# Altium PCB Phaser.PcbDoc (part 14 of 16)
Units mm, origin at the board's own origin, x right, y up, seen from the top; angles counter-clockwise.
Board outline 161.99 x 100 mm, 6 copper layers (TopLayer, MidLayer1, MidLayer2, SignalLayer1, Internal Plane 1, BottomLayer), stack 1.528 mm thick; 1017 components, 665 nets, 3453 pads, 2223 vias.
Unrouted connection lines stored in the file: 1.
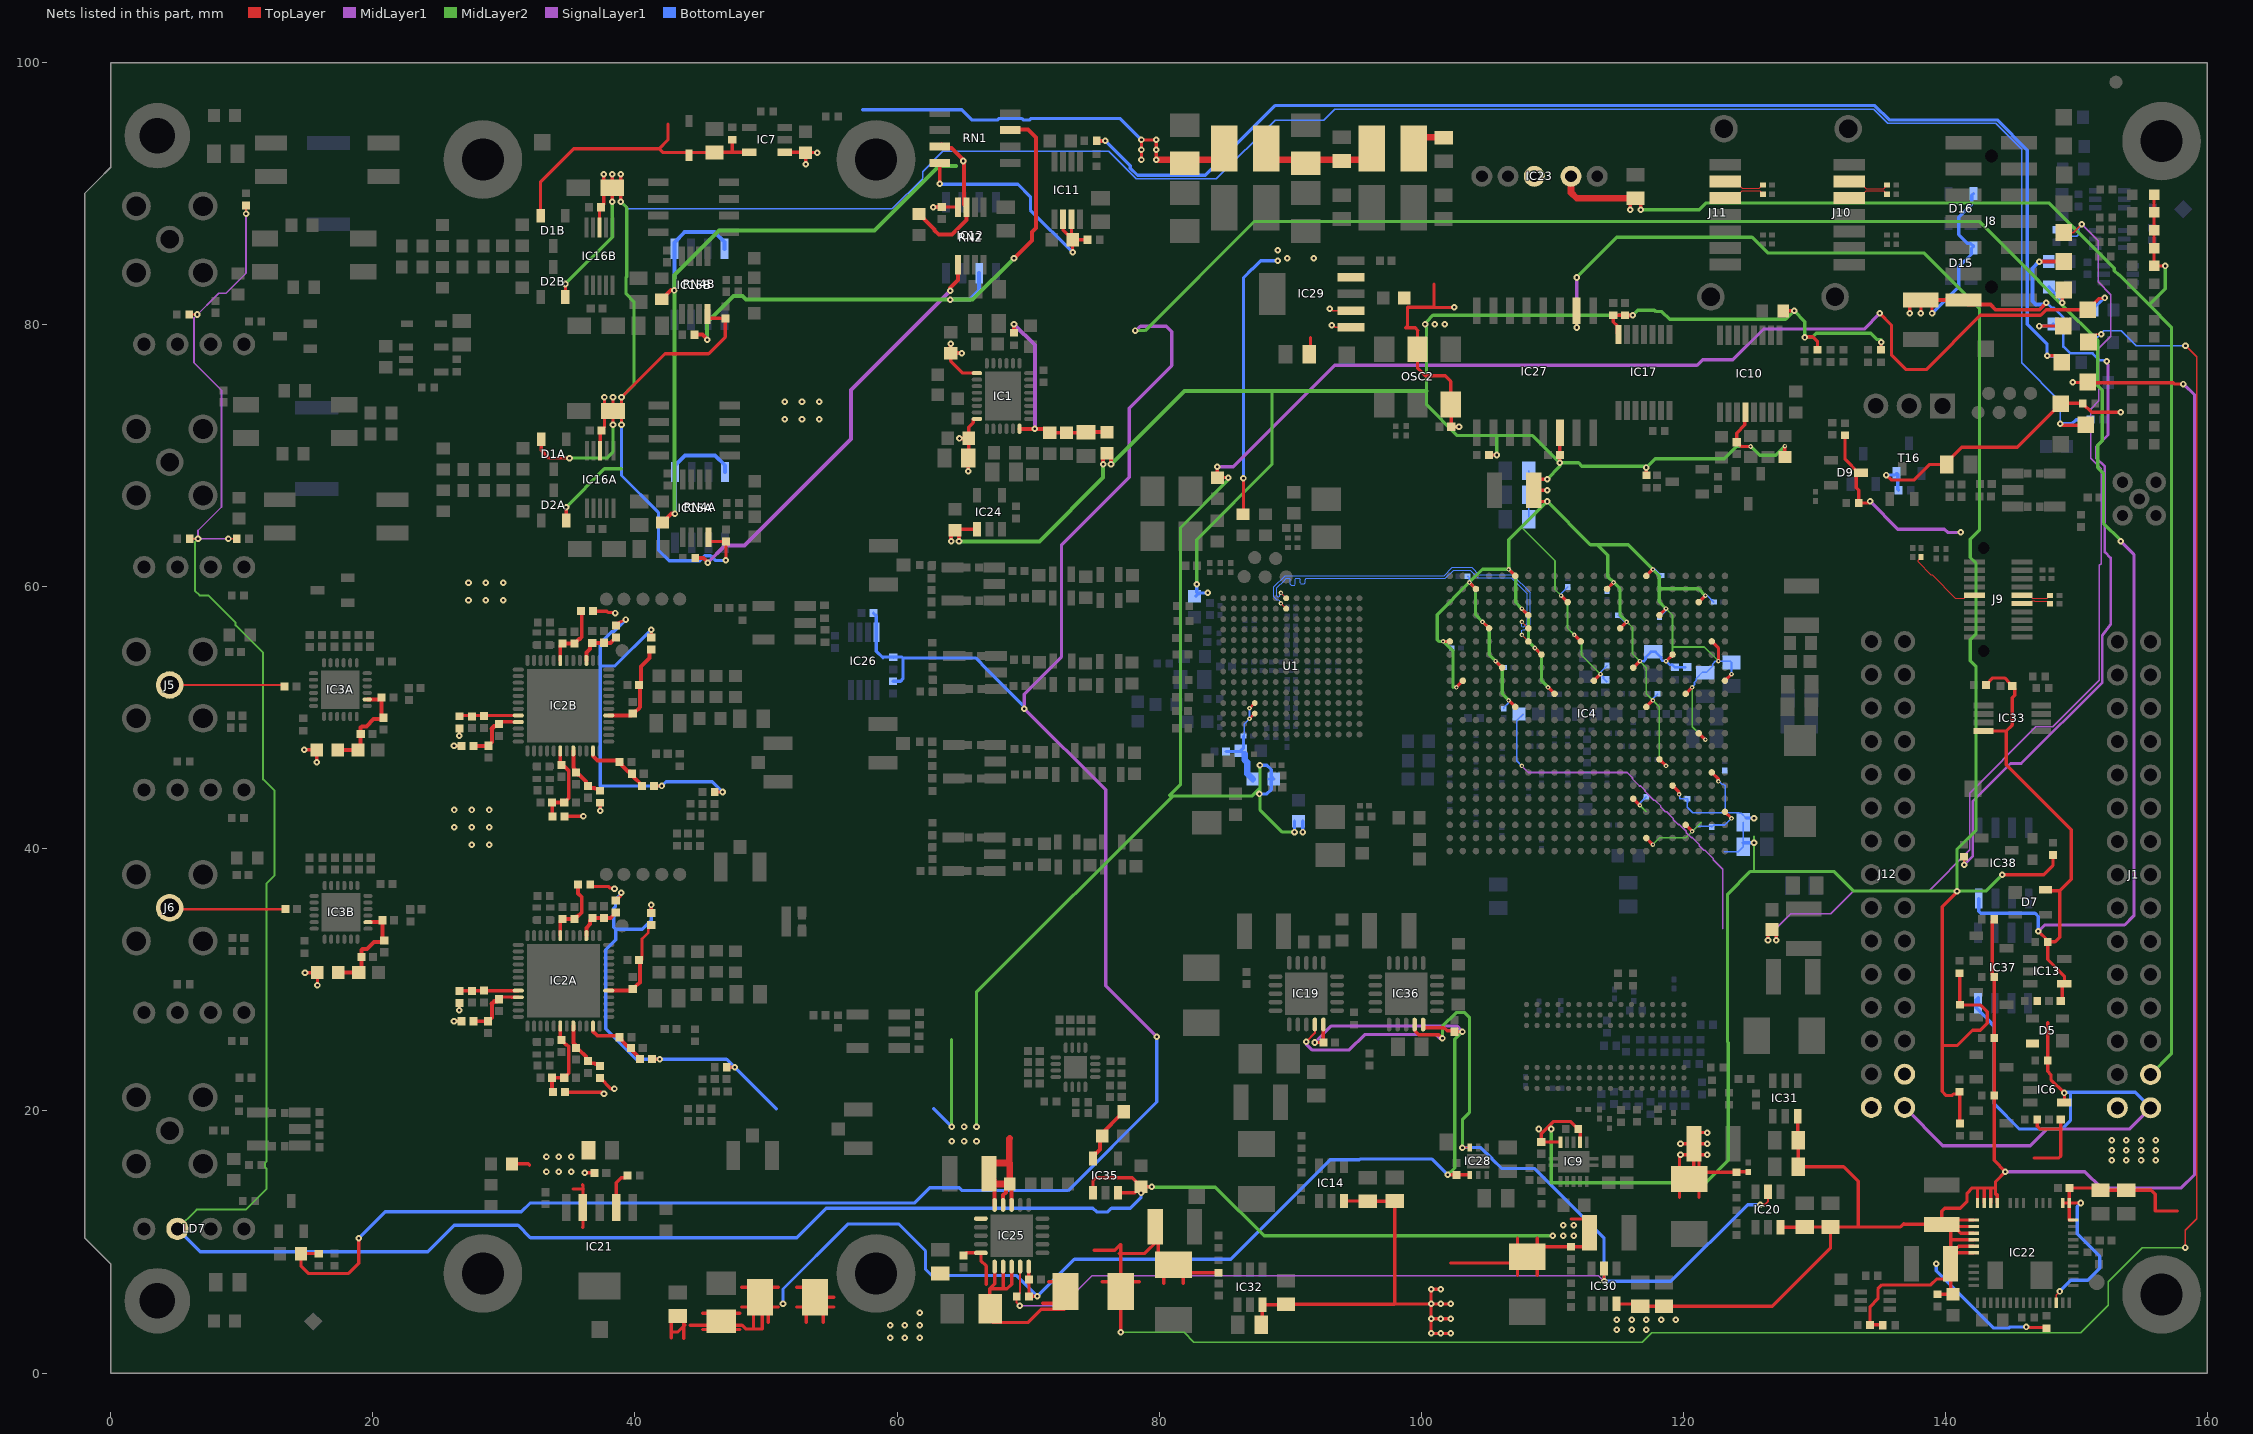
[diagram p16: the nets of this part, all layers, seen from the top]

## Via types
v1: diameter 0.5, hole 0.2, TopLayer to BottomLayer, tented both sides, 1374 vias
v2: diameter 0.35, hole 0.15, TopLayer to BottomLayer, tented both sides, 728 vias
v3: diameter 0.5, hole 0.2, TopLayer to BottomLayer, tented top, 96 vias
v4: diameter 0.6, hole 0.3, TopLayer to BottomLayer, 18 vias
v5: diameter 0.5, hole 0.2, TopLayer to BottomLayer, 5 vias
v6: diameter 0.35, hole 0.15, TopLayer to BottomLayer, 1 vias
v7: diameter 0.8, hole 0.5, TopLayer to BottomLayer, tented both sides, 1 vias

## Nets (pads, with @x,y where several pads share a name; then routed paths per layer and width w, separated by ;. In a path a pad name is that pad's centre, name@x,y a point inside that pad or via, vN(x,y) a via of type N, cw(c..) or ccw(c..) an arc to the next point about the centre after c; other vN are vias at no path point) (continued)
P1V8: C232.2 C336.2 L4.1 L26.1 L50.2 R166.2 R210.2 TP10.1 | length 124.9
  TopLayer w0.1: TP10.1@149.023,87.027 149.76,87.027 v1(150.394,87.661)
  TopLayer w0.25: 119.7,13.387 v1@119.7,16.651 ; v1(119.782,16.651) C336.2@120.8,16.651 ; v1(119.782,17.5) C336.2@120.8,17.5 ; L50.2@120.45,14.8 L50.2@120.8,15.15 ; C336.2@120.763,18.349 v1(121.818,18.349) ; 121.2,13.387 L50.2@121.2,15.315 ; C336.2@121.2,16.212 L50.2@121.2,15.315 ; v1(121.818,16.651) C336.2@120.8,16.651 ; v1(121.818,17.5) C336.2@120.8,17.5 ; C232.2@124.95,15.35 124.085,15.35 R166.2@124.05,15.315 L50.2@121.2,15.315 ; v1(126.457,33.025) L26.1@126.457,33.85 ; v1(127.093,33.025) L26.1@127.093,33.85 ; L50.2@120.8,15.15 C336.2@120.8,16.651 ; L50.2@120.8,15.15 120.965,15.315 L50.2@121.2,15.315 ; C336.2@120.8,16.651 C336.2@120.8,17.5
  MidLayer1 w0.125: v2(107.675,46.325) 108.174,45.826 115.722,45.826 116.118,45.43 116.118,45.334 116.655,44.797 116.751,44.797 117.069,44.479 117.069,44.383 117.74,43.712 117.836,43.712 118.288,43.26 118.288,43.164 118.627,42.825 118.723,42.825 119.231,42.317 119.231,42.221 119.599,41.853 119.695,41.853 120.217,41.331 120.217,41.235 120.592,40.86 120.688,40.86 121.214,40.334 121.214,40.238 121.553,39.899 121.649,39.899 122.288,39.26 122.288,39.164 123.005,38.447 123.005,33.925
  SignalLayer1 w0.1: v1(127.093,33.025) 127.093,33.954 128.202,35.063 131.258,35.063 133.012,36.817 138.747,36.817 141.844,39.914 141.844,44.256 146.906,49.317 148.184,49.317 151.738,52.871 151.738,61.62 151.881,61.763 151.881,69 151.07,69.811 151.07,73.56 151.691,74.181 151.691,78.192 152.606,79.107 152.606,82.296 151.643,83.259 151.643,86.412 v1(150.394,87.661)
  BottomLayer w0.1: R210.2@148.463,87.224 148.924,87.224 149.389,86.759 150.027,86.759 150.176,86.909 150.176,87.335 150.394,87.553 v1(150.394,87.661)
  BottomLayer w0.125: v2(107.675,46.325) 107.287,46.712 107.287,49.485 107.293,49.491 107.293,49.793 L4.1@107.775,50.275
P1V8A: C340.2 IC35.5 L10.2 | length 4.6
  TopLayer w0.3: IC35.5@74.954,16.363 74.954,16.588 75.104,16.738 75.171,16.738 75.493,17.06 75.493,18.135 L10.2@77.293,19.935
P2V5: C55.2 C58.2 C61.2 C62.2 C64.2 C66.2 C67.2 C68.2 C70.2 C71.2 C72.2 C73.2 C74.2 C75.2 C82.2 C207.2 C209.2 C210.2 C212.2 C217.2 C218.2 C238.2 C278.2 C279.2 C361.2 D15.4 D16.4 IC4.A17 IC4.AA17 IC4.AB14 IC4.B14 IC4.C21 IC4.D18 IC4.E15 IC4.F12 IC4.F22 IC4.G19 IC4.H16 IC4.J13 IC4.K20 IC4.L17 IC4.M14 IC4.N21 IC4.P18 IC4.R15 IC4.T12 IC4.T22 IC4.U8 IC4.U19 IC4.V16 IC4.W13 IC4.Y10 IC4.Y20 IC10.12 IC17.14 IC24.1 IC27.14 IC29.4 J8.2 L7.2 L8.2 OSC2.2 OSC2.6 R42.2 R57.2 R89.1 R93.2 R94.2 R95.2 R96.2 R185.2 R188.2 R211.2 R233.2 R235.2 R236.2 TP4.1 | length 408.1
  TopLayer w0.125: C58.2@138.127,81.873 C58.2@138.975,81.873
  TopLayer w0.2: v1(141.425,38.775) R57.2@141.425,39.38
  TopLayer w0.25: C55.2@64.425,64.325 64.475,64.375 IC24.1@66.1,64.375 ; 100.981,83.075 100.981,81.35 100.956,81.325 98.956,81.325 98.956,79.9 98.806,79.75 99.546,79.75 99.746,79.55 99.721,79.55 OSC2.2@99.721,78.105 99.721,76.66 100.29,76.091 101.833,76.091 102.261,75.663 OSC2.6@102.261,73.905 102.285,73.881 C238.2@102.285,72.207 v1(102.882,72.207) ; 101.006,81.325 101.021,81.31 v1(102.531,81.31) ; v2(101.675,55.825) IC4.A17@102.175,55.825 ; v2(102.675,52.325) IC4.B14@103.175,52.825 ; v2(103.675,60.325) IC4.C21@104.175,59.825 ; v2(104.675,57.325) IC4.D18@105.175,56.825 ; R96.2@105.17,70.05 v1(105.768,70.05) ; v2(105.675,54.325) IC4.E15@106.175,53.825 ; v2(106.675,51.325) IC4.F12@107.175,50.825 ; v2(106.675,61.325) IC4.F22@107.175,60.825 ; v2(107.675,58.325) IC4.G19@108.175,57.825 ; C218.2@108.586,66.506 v1(109.604,66.506) ; C218.2@108.586,67.355 v1(109.604,67.355) ; C218.2@108.586,68.204 v1(109.604,68.204) ; v2(108.675,55.325) IC4.H16@109.175,54.825 ; v2(109.675,52.325) IC4.J13@110.175,51.825 ; v1(110.575,69.452) C278.2@110.575,70.05 110.575,71.745 IC27.14@110.58,71.75 ; v2(110.675,59.325) IC4.K20@111.175,58.825 ; v2(111.675,56.325) IC4.L17@112.175,55.825 ; IC4.M14@113.175,52.825 v2(113.675,53.325) ; IC4.N21@114.175,59.825 v2(114.675,60.325) ; IC17.14@115.05,79.25 114.95,79.35 114.95,79.9 114.65,80.2 R94.2@114.65,80.705 R95.2@115.55,80.705 ; IC4.P18@115.175,56.825 v2(115.675,57.325) ; IC4.R15@116.175,53.825 v2(116.675,54.325) ; IC4.T12@117.175,50.825 v2(117.675,51.325) ; IC4.T22@117.175,60.825 v2(117.675,61.325) ; R42.2@117.175,68.495 v1(117.175,69.093) ; IC4.U8@118.175,46.825 v2(118.675,46.325) ; IC4.U19@118.175,57.825 v2(118.675,58.325) ; v2(118.675,54.325) IC4.V16@119.175,54.825 ; IC4.W13@120.175,51.825 v2(120.675,52.325) ; IC4.Y10@121.175,48.825 v2(121.675,48.325) ; IC4.Y20@121.175,58.825 v2(121.675,59.325) ; IC4.AA17@122.175,55.825 122.675,55.325 v2(122.675,54.325) ; IC4.AB14@123.175,52.825 v2(123.675,53.325) ; IC10.12@124.745,73.3 124.692,73.247 124.692,72.347 124.07,71.725 C279.2@124.07,71.025 124.394,70.701 v2(125.136,70.701) ; R185.2@127.625,81.05 v1(128.45,81.05) ; R188.2@127.745,69.9 v2(127.745,70.725) ; v1(129.272,79.019) 129.32,79.067 129.877,79.067 130.241,78.703 R235.2@130.241,78.091 ; R236.2@135.087,78.07 v1(135.087,78.668) ; v1(137.278,80.855) C58.2@137.278,81.873 ; v1(138.127,80.855) C58.2@138.127,81.873 ; v1(138.975,80.855) C58.2@138.975,81.873
  TopLayer w0.3: v1(64.123,63.461) 64.128,63.466 C55.2@64.128,64.291 ; C55.2@64.722,64.291 64.722,63.466 v1(64.727,63.461) ; v1(75.723,69.336) 75.728,69.341 L8.2@75.728,70.166 ; L8.2@76.322,70.166 76.322,69.341 v1(76.327,69.336) ; R95.2@115.55,80.705 v1(116.13,80.705) ; C58.2@138.127,81.873 138.128,81.875 J8.2@141.375,81.875 141.725,81.525 143.422,81.525 143.811,81.136 147.172,81.136 147.68,81.644 v1(147.68,81.661) ; v1(147.142,84.811) 149.015,84.811 TP4.1@149.023,84.819
  MidLayer2 w0.125: 107.642,64.544 110.211,61.976 110.211,59.789 v2(110.675,59.325) 111.159,58.841 111.159,56.841 v2(111.675,56.325) 112.225,55.775 112.225,54.775 v2(113.675,53.325) ; v2(115.675,57.325) 116.115,56.885 116.115,54.885 v2(116.675,54.325) 117.175,53.825 117.175,51.825 v2(117.675,51.325) 118.165,50.835 118.165,46.835 v2(118.675,46.325) ; v2(118.675,54.325) 119.175,54.825 119.175,55.398 ; v2(118.675,58.325) 119.175,57.825 119.175,55.398 ; v2(120.675,52.325) 120.675,49.325 v2(121.675,48.325) ; v2(122.675,54.325) 121.602,55.398 119.175,55.398
  MidLayer2 w0.25: v1(82.871,60.178) 82.871,63.598 88.611,69.338 88.611,74.949 ; 102.428,52.332 102.428,55.072 v2(101.675,55.825) 101.35,55.825 101.213,55.962 101.213,57.863 v2(103.675,60.325) ; v1(105.768,70.05) 105.768,71.497 105.803,71.532 ; v2(106.675,51.325) 106.176,51.824 106.176,53.824 v2(105.675,54.325) 105.182,54.818 105.182,56.818 v2(104.675,57.325) 104.141,57.859 104.141,59.859 v2(103.675,60.325) ; v1(109.604,68.204) 110.575,69.174 v1(110.575,69.452) ; v2(109.675,52.325) 109.184,52.816 109.184,54.816 v2(108.675,55.325) 108.187,55.813 108.187,57.813 v2(107.675,58.325) 107.204,58.796 107.204,60.796 v2(106.675,61.325) ; v2(115.675,57.325) 115.172,57.828 115.172,59.828 v2(114.675,60.325) 114.225,60.775 114.225,62.405 113.429,63.201 ; v1(117.175,69.093) 117.844,69.762 123.131,69.762 124.07,70.701 v2(125.136,70.701) 125.813,70.025 127.045,70.025 v2(127.745,70.725) ; v1@117.175,69.2 112.258,69.2 112.005,69.452 v1(110.575,69.452) ; v2(118.675,58.325) 118.165,58.835 118.165,59.843 ; v2(121.675,59.325) 121.157,59.843 118.165,59.843 ; v1@135.091,78.831 135.061,78.862 134.78,78.862 134.621,79.021 134.621,79.032 134.314,79.339 130.148,79.339 129.872,79.062 129.315,79.062 v1(129.272,79.019) 129.272,80.228 v1(128.45,81.05) 127.8,80.4 118.95,80.4 118.353,80.998 117.905,80.998 117.803,81.1 116.525,81.1 v1(116.13,80.705) 100.889,80.705 100.409,80.225 100.409,74.949 100.409,73.873 102.75,71.532 105.803,71.532 ; v2(103.675,60.325) 104.675,61.325 v2(106.675,61.325) ; 105.803,71.532 108.495,71.532 v1(110.575,69.452) ; v2(106.675,61.325) 106.675,63.577 107.642,64.544 v1(109.604,66.506) 112.909,63.201 113.429,63.201 ; 113.429,63.201 115.799,63.201 v2(117.675,61.325) 118.165,60.835 118.165,59.843
  MidLayer2 w0.3: v1(64.727,63.461) 70.859,63.461 75.723,68.325 v1(75.723,69.336) ; v1(76.327,69.336) 81.94,74.949 88.611,74.949 100.409,74.949
  SignalLayer1 w0.2: v1(141.425,38.775) 142.071,39.421 142.071,43.607 144.974,46.51 145.769,46.51 151.964,52.705 151.964,56.209 151.964,56.275 ; 151.965,56.275 152.606,57.142 152.606,62.2 152.167,62.639 152.167,69.169 151.499,69.837 151.499,70.672 152.4,71.573 152.4,76.949 152.356,76.993 152.356,77.159 v1(152.298,77.216)
  BottomLayer w0.125: v2(101.675,55.825) 102.037,55.463 102.187,55.463 C75.2@102.325,55.325 ; C207.2@103.543,60.799 103.675,60.667 v2(103.675,60.325) ; v2(105.675,54.325) 106.022,53.978 106.195,53.978 C74.2@106.329,53.845 ; C70.2@106.3,50.687 106.3,50.777 106.632,51.109 106.632,51.282 v2(106.675,51.325) ; C72.2@108.201,65.143 C71.2@108.201,68.859 ; v2(110.675,59.325) 110.675,59.475 C217.2@111.175,59.975 ; v2(113.675,53.325) 113.675,53.475 C73.2@114.175,53.975 ; C68.2@114.175,59.675 114.313,59.813 114.313,59.963 v2(114.675,60.325) ; C62.2@115.025,57.825 115.525,57.325 v2(115.675,57.325) ; v2(117.675,51.325) 117.675,51.45 C64.2@118.025,51.8 ; v2(117.675,61.325) 117.825,61.325 C61.2@118.325,60.825 ; C212.2@118.175,57.675 118.675,58.175 v2(118.675,58.325) ; v2(120.675,52.325) 120.675,52.333 120.852,52.511 120.852,52.721 120.997,52.865 120.997,53.023 121.459,53.485 121.774,53.485 122.237,53.948 122.237,54.105 122.434,54.303 122.653,54.303 v2(122.675,54.325) 123.575,54.325 C66.2@123.675,54.225 v2(123.675,53.325) ; v2(121.675,59.325) 121.825,59.325 C210.2@122.325,58.825
  BottomLayer w0.152: v2(113.675,53.325) 113.916,53.084 113.916,52.987 114.13,52.773 R233.2@114.15,52.773
  BottomLayer w0.2: v2(116.675,54.325) 116.993,54.325 117.11,54.442 117.11,54.611 117.535,55.036 C82.2@117.71,55.036 117.885,55.036 118.31,54.611 118.31,54.466 118.427,54.349 118.651,54.349 v2(118.675,54.325) 118.965,54.035 119.16,54.035 R93.2@119.35,53.845 R89.1@120.15,53.845 ; v1(147.68,81.661) 147.728,81.661 148.093,81.296 148.234,81.296 148.996,80.534 148.996,78.329 149.522,77.803 151.228,77.803 151.757,77.273 152.241,77.273 v1(152.298,77.216)
  BottomLayer w0.25: L7.2@82.809,59.265 83.073,59.528 v1(83.696,59.528) ; L7.2@82.871,59.554 v1(82.871,60.178) ; L7.2@83.006,59.436 L7.2@83.063,59.494 ; v1(138.975,80.855) 141.021,82.901 141.021,84.404 141.986,85.369 141.986,85.822 142.143,85.979 141.94,86.182 141.707,86.182 141.021,86.868 141.021,88.204 142.011,89.195 142.011,89.872 D16.4@142.143,90.004
  BottomLayer w0.3: v1@147.625,81.661 147.5,81.535 146.887,81.535 146.634,81.788 146.634,84.302 147.138,84.806 147.142,84.806 v1(147.142,84.811) R211.2@147.879,84.811
  other v1: 100.29,80.025 101.04,80.025 101.79,80.025
P2V5A: C20.2 C21.2 C78.2 IC1.14 L8.1 R1.2 | length 16.3
  TopLayer w0.3: R1.2@68.925,79.37 68.925,80.094 68.925,80.11 v1(68.925,80.019) ; IC1.14@69.35,72.05 v1(70.516,72.05) 71.35,72.05 C21.2@71.65,71.75 C20.2@72.925,71.75 74.4,71.75 C78.2@74.425,71.775 74.45,71.8 L8.1@76.025,71.8
  SignalLayer1 w0.3: v1(68.925,80.019) 70.516,78.428 v1(70.516,72.05)
P3V3: C42.2 C63.2 C76.2 C77.2 C79.2 C172.2 C208.2 C216.2 C339.2 C344.2 D9.3 IC4.AA7 IC4.AB4 IC4.R5 IC4.T2 IC4.V6 IC4.W3 IC9.7 IC9.10 IC27.2 IC29.1 IC29.2 IC35.1 IC35.3 L47.2 LD7.2 R29.1 R64.1 R78.1 R84.1 R92.2 R127.2 R141.1 R146.1 R198.2 R214.2 R231.2 R259.1 R260.1 R262.2 R276.1 TP7.1 | length 493.7
  TopLayer w0.125: v1(93.02,81.198) 93.122,81.198 93.251,81.069 IC29.2@94.627,81.069 ; v1(93.185,79.955) 93.287,79.955 93.442,79.799 IC29.1@94.627,79.799
  TopLayer w0.127: R64.1@5.982,80.772 v1(6.612,80.772) ; R260.1@6.03,63.662 v1(6.66,63.662) ; v1(8.985,63.662) R259.1@9.615,63.662 ; v1(10.326,88.46) R29.1@10.326,89.09
  TopLayer w0.25: IC35.1@74.954,13.763 74.954,14.684 75.17,14.9 77.942,14.9 78.244,14.597 78.244,14.572 C339.2@78.594,14.222 ; IC35.3@76.854,13.763 78.135,13.763 C339.2@78.594,14.222 ; v1(78.619,13.742) C339.2@78.619,14.222 ; v1(79.444,14.222) C339.2@78.619,14.222 ; R231.2@86.395,65.527 86.433,65.564 v1(86.433,68.273) ; 91.544,79 91.544,77.955 91.746,77.754 C42.2@91.742,77.75 ; 102.225,8.4 104.175,8.4 L47.2@107.35,8.4 ; 107.35,7.462 L47.2@107.35,8.4 ; 107.35,10.287 L47.2@107.35,8.4 ; 108.85,7.462 L47.2@108.85,9.625 ; 108.85,10.287 L47.2@108.85,9.625 ; IC9.10@110.628,17.612 110.603,17.637 C172.2@109.153,17.637 109.153,18.262 110.078,19.187 111.398,19.187 R127.2@111.973,18.612 112.128,18.457 IC9.7@112.128,17.612 ; 111.425,11.755 C344.2@112.795,11.755 ; IC27.2@111.85,81.05 111.853,81.047 111.853,79.782 v1(111.855,79.779) ; C344.2@112.85,10.7 112.85,9.7 112.795,9.645 R198.2@111.425,9.645 108.87,9.645 L47.2@108.85,9.625 ; IC4.R5@116.175,43.825 v2(116.675,43.325) ; IC4.T2@117.175,40.825 v2(117.675,40.325) ; IC4.V6@119.175,44.825 119.656,44.344 119.656,44.171 v2(119.675,44.152) ; IC4.W3@120.175,41.825 v2(120.675,41.325) ; IC4.AA7@122.175,45.825 122.656,45.344 122.656,45.169 v2(122.675,45.15) ; IC4.AB4@123.175,42.825 v2(123.675,42.325) ; R276.1@132.341,71.543 132.341,69.721 133.357,68.704 D9.3@133.557,68.704 133.388,68.704 133.188,68.504 133.188,67.557 133.377,67.368 R262.2@133.377,66.392 134.122,66.392 v1(134.244,66.514) ; v1@140.911,36.736 139.75,35.575 139.75,25 ; R146.1@141.075,30.505 141.1,30.48 R84.1@141.1,28.09 142.665,28.09 143.195,27.56 143.195,26.691 142.65,26.146 142.063,26.146 140.917,25 139.75,25 ; R78.1@141.1,19.04 141.1,21.43 R141.1@141.075,21.455 140.911,21.291 140.609,21.291 140.492,21.175 140.058,21.175 139.75,21.483 139.75,25 ; v1(144.33,38.018) 147.5,38.018 148.2,38.719 R92.2@148.2,39.53 ; v1(147.142,79.891) TP7.1@149,79.891 ; C339.2@78.594,14.222 C339.2@78.619,14.222 ; L47.2@107.35,8.4 107.625,8.4 L47.2@108.1,8.875 L47.2@108.85,9.625
  MidLayer2 w0.125: v2(116.675,43.325) 117.172,42.828 ; v2(117.675,40.325) 118.185,40.835 120.185,40.835 v2(120.675,41.325) 121.369,42.019 ; 125.39,38.278 v1(125.39,40.471) 125.39,40.952
  MidLayer2 w0.152: LD7.2@5.09,11 6.561,12.471 10.319,12.471 11.876,14.028 11.876,14.99 11.892,15.006 11.892,15.34 11.876,15.356 11.876,15.604 11.78,15.699 11.78,16.032 11.876,16.127 11.876,37.33 12.514,37.969 12.514,44.42 11.633,45.301 11.633,54.952 9.535,57.05 9.535,57.238 7.437,59.336 6.78,59.336 6.426,59.69 6.426,63.399 6.66,63.633 v1(6.66,63.662)
  MidLayer2 w0.25: 79.068,14.185 84.291,14.185 88.007,10.468 v1(110.041,10.468) ; v1(109.928,18.62) 109.928,14.526 121.712,14.526 123.43,16.244 123.43,25.211 123.375,25.266 123.375,36.532 125.12,38.278 125.39,38.278 131.493,38.278 132.997,36.774 v1(140.881,36.774) ; v1(111.855,83.596) 114.926,86.666 125.246,86.666 126.445,85.467 138.352,85.467 142.601,81.219 142.601,64.343 141.885,63.627 141.885,62.228 142.337,61.776 142.337,56.407 141.885,55.955 141.885,54.348 142.337,53.897 142.337,41.416 140.881,39.96 v1(140.881,36.774) ; v1(144.33,38.018) 143.086,36.774 v1(140.881,36.774)
  SignalLayer1 w0.125: v1(6.66,63.662) v1(8.985,63.662)
  SignalLayer1 w0.127: v1(6.66,63.662) 6.66,64.295 8.454,66.088 8.454,74.981 6.35,77.085 6.35,80.51 8.233,82.393 8.794,82.393 10.326,83.925 v1(10.326,88.46)
  SignalLayer1 w0.25: v1(111.855,79.779) v1(111.855,83.596) ; v1(134.244,66.514) 136.365,64.393 139.906,64.393 140.158,64.141 v1(141.175,64.141)
  BottomLayer w0.125: v2(116.675,43.325) 116.675,43.475 C79.2@117.175,43.975 ; v2(119.675,44.152) 119.736,44.152 119.736,43.825 C216.2@120.325,43.825 120.313,43.813 120.313,43.511 120.288,43.485 120.288,43.164 120.708,42.744 123.193,42.744 ; v2(120.675,41.325) 121.078,41.728 122.122,41.728 C63.2@122.175,41.675 122.175,41.679 122.312,41.817 123.167,41.817 v2(123.675,42.325) ; v2(122.675,45.15) 122.736,45.15 122.956,44.93 123.07,44.93 123.188,44.813 123.188,42.749 123.193,42.744 ; 123.137,39.767 124.179,39.767 C76.2@124.565,40.153 124.565,40.471 C77.2@124.565,42.027 ; C77.2@124.782,42.345 124.416,42.71 124.258,42.71 124.225,42.744 123.193,42.744
  BottomLayer w0.25: LD7.2@5.09,11 6.84,9.25 24.185,9.25 26.213,11.278 31.084,11.278 32.028,10.333 52.345,10.333 54.588,12.576 74.95,12.576 75.235,12.292 76.076,12.292 76.36,12.576 77.798,12.576 78.619,13.397 v1(78.619,13.742) ; v1(86.433,68.273) 86.433,83.557 86.812,83.937 86.812,83.953 87.12,84.261 87.136,84.261 87.748,84.873 v1(89.039,84.873) ; C76.2@124.565,40.471 v1(125.39,40.471) ; C77.2@124.782,42.345 v1(125.39,42.345) ; v1(147.142,79.891) 148.077,79.891 R214.2@148.222,80.035
  other v1: 110.841,10.468 111.641,10.468 110.841,11.268 111.641,11.268 108.98,18.62 89.764,85.066 91.793,85.066 89.039,85.66
P3V3_MP: C10.2 C48.2 C242.2 C353.2 D5.4 D7.4 IC6.4 IC13.4 IC26.8 IC33.8 IC37.8 IC38.8 J1.30 J12.30 R142.1 R143.2 R144.1 R148.1 R149.1 R162.2 R169.1 R171.2 R176.1 R212.2 TP5.1 | length 402
  TopLayer w0.25: R169.1@15.875,9.115 14.54,9.115 R143.2@14.525,9.1 14.525,8.14 15.065,7.6 18.15,7.6 18.925,8.375 v1(18.925,10.275) ; IC33.8@142.9,48.99 144.645,48.99 ; R176.1@143.095,52.5 143.095,52.52 143.614,53.039 144.509,53.039 144.915,52.633 144.915,52.61 145.285,52.24 145.285,51.778 145.311,51.752 145.101,51.542 145.101,49.446 144.645,48.99 ; 146.768,16.408 148.654,16.408 148.8,16.555 148.8,18.625 ; R142.1@146.995,19.35 146.995,18.83 147.2,18.625 148.8,18.625 ; v1(147.089,33.71) 147.795,33.004 R149.1@147.795,32.9 ; D7.4@147.625,36.873 147.698,36.8 148.711,36.8 ; 147.795,26.755 R144.1@147.795,23.85 147.795,23.03 148.05,22.775 148.05,22.395 v1(149.075,21.37) IC6.4@149.075,20.65 ; C10.2@148.8,19.35 148.8,18.625 ; C242.2@148.8,28.4 148.906,28.506 148.906,29.531 IC13.4@149.075,29.7 149.075,30.275 147.795,31.555 R149.1@147.795,32.9 ; v1(148.921,81.661) 148.921,82.538 TP5.1@149.023,82.64 ; 144.645,48.99 144.645,46.419 149.596,41.467 149.596,37.685 148.711,36.8 ; R149.1@147.795,32.9 148.362,32.9 148.711,33.249 148.711,36.8
  MidLayer2 w0.25: v1(78.168,79.547) 78.924,79.547 87.239,87.862 130.83,87.862 130.833,87.86 134.517,87.86 134.52,87.862 142.605,87.862 147.108,83.36 147.108,83.294 v1@148.831,81.571 ; v1(148.921,81.661) v1@148.831,81.571 ; v1@153.377,63.536 152.057,64.857 152.057,68.652 151.621,69.088 151.621,70.803 151.959,71.141 151.959,74.982 151.61,75.33 151.61,78.791 v1@148.831,81.571
  SignalLayer1 w0.25: v1(78.168,79.547) 78.235,79.547 78.572,79.884 80.537,79.884 80.964,79.457 80.964,76.874 77.719,73.629 77.719,68.337 72.542,63.16 72.542,54.634 69.714,51.806 v1(69.714,50.699) 75.916,44.497 75.916,29.551 v1(79.808,25.659) ; J12.30@136.884,20.264 139.798,17.35 146.475,17.35 147.738,18.613 154.029,18.613 J1.30@155.654,20.238 ; v1(147.089,33.71) 147.567,34.188 153.67,34.188 154.381,34.9 154.381,62.464 v1(153.377,63.467)
  BottomLayer w0.25: v1(18.925,10.275) 20.952,12.302 31.327,12.302 31.995,12.97 61.318,12.97 62.482,14.134 64.753,14.134 64.963,13.923 73.05,13.923 79.808,20.681 v1(79.808,25.659) ; C48.2@58.198,57.994 58.423,57.769 IC26.8@58.423,56.519 58.423,55.069 58.928,54.564 59.005,54.64 59.698,54.64 R162.2@59.715,54.623 59.73,54.637 60.375,54.637 60.448,54.564 ; R171.2@59.698,52.789 60.268,52.789 60.448,52.969 60.448,54.564 ; 69.589,50.945 66.884,53.65 66.884,53.672 65.992,54.564 60.448,54.564 ; IC37.8@142.495,28.206 142.495,28.651 142.344,28.5 142.344,27.882 143.5,26.726 143.5,26.65 143.72,26.43 143.72,20.544 145.65,18.613 148.886,18.613 149.538,19.265 149.538,21.417 ; IC38.8@142.545,36.209 142.545,35.231 142.691,35.085 146.838,35.085 147.089,34.834 v1(147.089,33.71) ; R212.2@147.904,82.88 147.904,82.83 148.873,81.861 148.873,81.709 v1(148.921,81.661) ; v1(149.075,21.37) 149.123,21.417 149.538,21.417 ; J1.30@155.654,20.238 154.475,21.417 149.538,21.417
P3V3A: C257.2 IC25.1 IC25.18 IC25.19 IC25.20 L14.2 L17.2 L19A.2 L19B.2 L20A.2 L20B.2 L22A.2 L22B.2 L24A.2 L24B.2 L25A.2 L25B.2 L27A.1 L27B.1 L41.2 L52A.2 L52B.2 R167.2 R213.2 TP6.1 | length 252.4
  TopLayer w0.25: L25B.2@34.619,42.477 v1(36.072,42.477) ; L25A.2@34.66,21.436 34.674,21.422 37.465,21.422 37.574,21.314 v5(37.641,21.314) ; L27A.1@36.589,37.279 36.739,37.129 37.96,37.129 38.077,37.012 38.395,37.012 v5(38.443,36.965) ; L27B.1@36.81,58.137 37.842,58.137 37.938,58.04 38.441,58.04 v5(38.488,57.992) ; L20A.2@37.346,22.514 38.169,21.692 v1(38.437,21.692) ; v1(37.346,42.914) L20B.2@37.346,43.514 ; L24A.2@38.546,36.051 38.906,36.411 38.906,36.604 v1(38.954,36.651) ; L24B.2@38.546,57.051 38.731,57.226 v1(39.3,57.495) ; L19A.2@41.245,35.116 v1(41.245,35.716) ; L19B.2@41.245,56.116 v1(41.245,56.716) ; L22A.2@41.303,23.952 v1(41.903,23.952) ; L22B.2@41.458,44.797 v1(42.058,44.797) ; L52B.2@46.086,44.335 v1(46.686,44.335) ; L52A.2@47.011,23.335 v1(47.611,23.335) ; v1(84.443,69.15) L17.2@84.443,68.325 v1(85.268,68.325) ; v1(134.993,80.855) 135.878,79.97 135.878,77.709 137.015,76.571 138.532,76.571 142.665,80.705 147.255,80.705 147.686,81.136 TP6.1@150.858,81.136 151.721,82 152.122,82 v1(152.156,82.034)
  TopLayer w0.3: C257.2@67.025,15.2 67.45,14.775 67.45,14.425 IC25.20@67.45,12.825 ; IC25.19@68.1,12.825 68.1,13.575 68.3,13.775 R167.2@68.3,14.05 ; R167.2@68.6,14.425 68.75,14.275 IC25.18@68.75,12.825
  TopLayer w0.5: C257.2@67.425,16.025 68.575,16.025 ; C257.2@67.45,14.425 R167.2@68.6,14.425 68.6,16 68.575,16.025 ; 68.6,17.9 68.575,17.875 68.575,16.025
  MidLayer2 w0.25: v1(64.162,18.805) 64.162,25.452 ; v1(66.062,18.805) 66.062,29.061 81.026,44.025 ; v1@85.243,68.125 81.636,64.518 81.636,44.911 80.818,44.093 80.885,44.025 81.026,44.025 ; v1(87.654,44.187) v1@87.693,44.187 ; v1(87.693,46.37) 87.693,44.634 ; v1@90.302,41.28 89.406,41.28 87.693,42.994 v1@87.693,44.187 ; 81.026,44.025 87.083,44.025 87.693,44.634 ; v1@87.693,44.187 87.693,44.634
  SignalLayer1 w0.25: v1(84.443,69.15) 85.652,69.15 93.406,76.904 121.049,76.904 121.464,77.319 123.774,77.319 126.115,79.66 133.797,79.66 v1(134.993,80.855)
  BottomLayer w0.25: v1(38.954,36.651) 38.954,36.592 38.523,36.161 38.523,35.6 38.393,35.471 38.393,34.011 38.546,33.858 ; v1(39.3,57.495) 38.372,56.567 38.227,56.567 37.346,55.686 37.346,53.95 ; v1(41.245,35.716) 41.245,34.539 40.564,33.858 38.546,33.858 ; v1(41.245,56.716) 38.478,53.95 37.346,53.95 ; v1(46.686,44.335) 45.911,45.11 42.371,45.11 v1(42.058,44.797) 37.354,44.797 37.346,44.806 37.346,53.95 ; 50.779,20.168 v1(47.611,23.335) 46.994,23.952 v1(41.903,23.952) 40.086,23.952 37.784,26.254 37.784,32.298 38.546,33.06 38.546,33.858 ; 62.8,20.168 v1(64.162,18.805) ; v1(87.654,44.187) 88.213,44.187 88.545,44.518 L14.2@88.545,45.325 ; v1(87.693,46.37) 88.228,46.37 88.545,46.054 L14.2@88.545,45.521 ; L14.2@88.401,45.325 L14.2@88.545,45.325 ; v1(90.327,41.28) L41.2@90.327,42.105 ; v1(90.963,41.28) L41.2@90.963,42.105 ; R213.2@151.219,81.102 151.219,81.152 152.101,82.034 v1(152.156,82.034) ; L14.2@88.545,45.325 L14.2@88.545,45.521 ; L14.2@88.545,45.325 L14.2@88.741,45.325 L14.2@88.545,45.521
  other v1: 64.162,17.68 65.112,17.68 66.062,17.68 65.112,18.805
P3V3A_DIGA: C129A.2 C130A.2 IC2A.3 L24A.1 | length 3.5
  TopLayer w0.3: IC2A.3@36.3,33.375 36.3,33.971 36.588,34.259 36.588,34.548 36.748,34.708 C130A.2@36.754,34.714 37.641,34.714 C129A.2@37.648,34.72 38.135,34.72 38.386,34.971 38.386,34.981 L24A.1@38.536,35.131 L24A.1@38.546,35.131
P3V3A_DIGB: C129B.2 C130B.2 IC2B.3 L24B.1 | length 3.5
  TopLayer w0.3: IC2B.3@36.3,54.375 36.3,54.971 36.588,55.259 36.588,55.548 C130B.2@36.748,55.708 36.754,55.714 37.641,55.714 C129B.2@37.648,55.72 38.135,55.72 38.386,55.971 38.386,55.981 38.536,56.131 L24B.1@38.546,56.131
P3V3A_LO1A: C45A.2 C134A.2 IC2A.7 L27A.2 | length 5.3
  TopLayer w0.3: IC2A.7@34.3,33.375 34.3,34.496 C134A.2@34.461,34.657 C45A.2@35.382,34.657 35.551,34.826 35.611,34.826 35.94,35.155 35.94,35.937 35.941,35.938 35.941,36.315 35.669,36.586 L27A.2@35.669,37.279
P3V3A_LO1B: C45B.2 C134B.2 IC2B.7 L27B.2 | length 5
  TopLayer w0.3: IC2B.7@34.3,54.375 34.3,55.496 C134B.2@34.461,55.657 35.382,55.657 35.742,56.017 35.8,56.017 35.94,56.157 35.94,58.087 L27B.2@35.89,58.137
P3V3A_LO2A: C356A.2 C357A.2 C358A.2 IC2A.30 L25A.1 | length 6.4
  TopLayer w0.3: C358A.2@33.683,22.528 33.683,21.493 L25A.1@33.74,21.436 ; C358A.2@33.688,22.533 C356A.2@34.61,22.533 34.95,22.873 34.95,23.543 ; IC2A.30@34.3,26.475 34.3,25.494 34.742,25.052 34.799,25.052 34.951,24.901 34.951,23.544
P3V3A_LO2B: C356B.2 C357B.2 C358B.2 IC2B.30 L25B.1 | length 6.4
  TopLayer w0.3: C358B.2@33.683,43.528 33.691,43.521 33.691,42.485 L25B.1@33.699,42.477 ; C358B.2@33.688,43.533 C356B.2@34.61,43.533 ; IC2B.30@34.3,47.475 34.3,46.494 C357B.2@34.39,46.403 34.55,46.243 34.675,46.243 34.939,45.979 ; C356B.2@34.608,43.531 C356B.2@34.61,43.533 ; 34.95,45.979 34.95,44.513 34.951,44.512 34.951,43.874 C356B.2@34.61,43.533
P3V3A_PLLA: C44A.2 C126A.2 IC2A.41 L19A.1 | length 7.4
  TopLayer w0.203: C126A.2@40.538,31.511 40.538,33.136 41.024,33.623 41.024,33.879 41.036,33.891 41.036,33.998 41.235,34.196 L19A.1@41.245,34.196
  TopLayer w0.3: IC2A.41@38,29.175 39.695,29.175 40.186,29.666 40.244,29.666 40.385,29.807 40.385,31.448 C126A.2@40.321,31.511
P3V3A_PLLB: C44B.2 C126B.2 IC2B.41 L19B.1 | length 7.5
  TopLayer w0.203: L19B.1@41.235,55.196 L19B.1@41.245,55.196
  TopLayer w0.3: IC2B.41@38,50.175 39.695,50.175 C44B.2@39.835,50.315 39.995,50.475 40.059,50.475 40.301,50.717 40.301,50.723 40.384,50.806 40.384,52.449 C126B.2@40.321,52.511 40.462,52.652 40.462,53.916 41.097,54.551 41.097,55.059 L19B.1@41.235,55.196
P3V3A_VCO1A: C286A.2 C287A.2 IC2A.35 L22A.1 | length 5.3
  TopLayer w0.25: L22A.1@40.419,23.786 cw(c40.549,23.786) L22A.1@40.458,23.877
  TopLayer w0.3: IC2A.35@36.8,26.475 36.8,26.075 37.137,25.738 38.707,25.738 C286A.2@38.827,25.619 C286A.2@38.987,25.459 ; C286A.2@38.907,25.539 38.907,25.467 39.405,24.969 39.536,24.969 C287A.2@39.696,24.809 39.856,24.649 39.856,24.532 40.308,24.081 40.308,24.027 L22A.1@40.458,23.877
P3V3A_VCO1B: C286B.2 C287B.2 IC2B.35 L22B.1 | length 5.3
  TopLayer w0.25: L22B.1@40.499,44.706 cw(c40.629,44.706) L22B.1@40.538,44.797
  TopLayer w0.3: IC2B.35@36.8,47.475 36.8,47.075 37.137,46.738 38.707,46.738 C286B.2@38.827,46.619 38.987,46.459 38.987,46.387 39.485,45.889 39.616,45.889 C287B.2@39.776,45.729 39.936,45.569 39.936,45.452 40.388,45.001 40.388,44.947 L22B.1@40.538,44.797
P3V3A_VCO2A: C127A.2 C128A.2 IC2A.32 L20A.1 | length 4.4
  TopLayer w0.3: IC2A.32@35.3,26.475 35.3,25.187 C127A.2@35.536,24.951 ; C127A.2@35.349,24.935 35.616,24.668 35.744,24.668 36.264,24.148 36.264,23.957 C128A.2@36.424,23.797 36.583,23.638 36.922,23.638 36.976,23.584 37.196,23.584 L20A.1@37.346,23.434
P3V3A_VCO2B: C127B.2 C128B.2 IC2B.32 L20B.1 | length 4.4
  TopLayer w0.3: IC2B.32@35.3,47.475 35.3,46.187 C127B.2@35.536,45.951 ; C127B.2@35.349,45.935 35.616,45.668 35.744,45.668 36.264,45.148 36.264,44.957 C128B.2@36.424,44.797 36.583,44.638 36.922,44.638 36.976,44.584 37.196,44.584 L20B.1@37.346,44.434
P3V6: C348.2 L48.2 L51.1 R200.2 R215.2 TP15.1 | length 190.8
  TopLayer w0.1: TP15.1@150.915,78.668 151.5,79.253 151.87,79.253 v1(151.881,79.263) ; v1(158.293,9.576) 158.293,10.907 159.164,11.778 159.164,77.539 158.318,78.384 v1(158.317,78.384)
  TopLayer w0.25: 75.046,9.364 76.621,9.364 77.071,9.814 L51.1@77.071,6.314 ; 75.651,6.975 L51.1@77.063,6.975 ; 76.95,9.125 78.9,9.125 79.875,10.1 C348.2@79.875,10.2 ; v1(77.063,3.111) L51.1@77.063,6.225 L51.1@77.063,6.975 ; 78.476,6.975 L51.1@77.063,6.975 ; C348.2@79.705,11.176 C348.2@80.005,10.876 ; C348.2@79.875,10.5 C348.2@79.875,10.2 ; L48.2@79.925,8 79.925,10.15 C348.2@79.875,10.2 ; 80.35,6.843 L48.2@80.35,8.256 ; L48.2@81.1,7.586 L48.2@81.1,9.025 ; L48.2@81.1,8.256 81.205,8.361 L48.2@81.85,8.361 ; 81.85,6.843 L48.2@81.85,8.256 ; L48.2@81.85,7.655 R200.2@84.525,7.655
  MidLayer2 w0.1: v1(77.063,3.111) 81.903,3.111 82.652,2.362 116.866,2.362 117.57,3.067 150.31,3.067 152.432,5.189 152.432,6.953 155.03,9.55 158.267,9.55 v1(158.293,9.576)
  BottomLayer w0.1: R215.2@151.194,78.638 151.194,78.688 151.594,79.088 151.644,79.088 151.85,79.295 152.083,79.527 153.416,79.527 154.559,78.384 v1(158.317,78.384)
P3V6A: C160.1 C351.2 C352.1 IC25.5 IC25.6 IC25.7 IC25.8 L51.2 | length 22.3
  TopLayer w0.127: C160.1@65.075,8.975 C160.1@65.275,9.175
  TopLayer w0.25: C160.1@65.275,9.175 IC25.5@66.4,9.175 66.4,8.575 66.8,8.175 66.8,6.75 ; IC25.6@67.45,8.125 67.45,6.8 67.075,6.425 ; IC25.7@68.1,8.125 68.1,6.425 ; IC25.8@68.75,8.125 68.75,6.785 68.39,6.425 68.1,6.425 ; 71.113,5.325 L51.2@72.863,5.325 ; 71.584,6.975 L51.2@72.863,6.975 ; L51.2@72.75,4.875 71,4.875 69.975,3.85 67.35,3.85 67.075,4.125 67.075,6.425 ; 67.075,6.425 68.1,6.425
P5V0A: C17.2 C18.2 C19.2 C88.2 C155.2 C266.2 IC1.1 IC1.8 IC12.8 IC21.4 L16A.1 L16B.1 L34A.1 L34B.1 L35A.2 L35B.2 R4.1 R130.2 R216.2 TP16.1 | length 118.6
  TopLayer w0.25: v1(14.775,47.55) L16A.1@15.725,47.55 v1(15.725,46.6) ; v1(14.825,30.554) L16B.1@15.775,30.554 v1(15.775,29.604) ; v1(26.196,26.845) L35A.2@26.757,26.845 ; v1(26.196,47.855) L35B.2@26.757,47.855 ; v1(26.607,27.682) L34A.1@26.607,28.244 ; v1(26.607,48.629) L34B.1@26.607,49.191 ; R130.2@30.617,15.96 31.868,15.96 31.962,15.865 ; 35.275,14.05 36.03,14.05 ; 35.997,11.098 36.03,11.131 IC21.4@36.03,12.639 36.03,14.05 ; 35.997,14.376 36.03,14.344 36.03,14.05 ; 36.075,14.05 36.03,14.05 ; v1(36.185,15.275) C266.2@36.91,15.275 ; C88.2@63.41,88.967 64.655,88.967 IC12.8@64.66,88.962 ; C17.2@64.075,77.827 64.088,77.827 C17.2@64.094,77.827 ; C17.2@64.1,77.827 C17.2@64.094,77.827 ; v1(65.425,68.813) C19.2@65.425,69.825 65.475,69.875 65.475,71.313 C18.2@65.475,71.325 65.475,72.175 65.825,72.525 65.825,72.775 65.85,72.8 IC1.8@66.1,72.8 ; IC1.1@66.1,76.3 65.012,76.3 64.094,77.218 C17.2@64.094,77.827 ; v1(147.756,77.622) 148.378,77.622 TP16.1@148.87,77.13
  TopLayer w0.3: v1(62.755,88.967) C88.2@63.41,88.967 ; C17.2@64.088,77.827 v1(64.088,78.538) ; C17.2@64.1,77.827 v1@64.925,77.827 ; v1(64.764,71.313) C18.2@65.475,71.313 ; R4.1@75.24,94.025 v1(75.895,94.025)
  BottomLayer w0.25: v1(75.895,94.025) 77.803,92.117 77.803,91.937 78.35,91.391 83.512,91.391 88.835,96.714 134.622,96.714 135.72,95.616 143.95,95.616 146.245,93.32 146.245,80.018 147.756,78.507 v1(147.756,77.622) 147.804,77.575 148.308,77.575 148.393,77.489 148.443,77.489 148.768,77.164 R216.2@148.768,77.114
  other v1: 33.25,15.366 34.2,15.366 35.15,15.366 33.25,16.491 34.2,16.491 35.15,16.491 27.555,40.307 28.885,40.307 26.226,41.636 27.555,41.636 28.885,41.636 26.226,42.966 27.555,42.966 28.885,42.966 27.3,58.963 28.629,58.963 29.959,58.963 27.3,60.293 28.629,60.293 29.959,60.293 51.419,72.771 52.748,72.771 54.077,72.771 51.419,74.1 52.748,74.1 54.077,74.1 64.93,77.822
P5V0A_D2SA: C153A.2 C288A.2 IC2A.20 L34A.2 | length 4.5
  TopLayer w0.25: L34A.2@26.607,29.111 26.672,29.175 27.555,29.175 C153A.2@28.475,29.175 IC2A.20@31.1,29.175
P5V0A_D2SB: C153B.2 C288B.2 IC2B.20 L34B.2 | length 4.5
  TopLayer w0.25: L34B.2@26.607,50.111 26.672,50.175 27.555,50.175 28.475,50.175 IC2B.20@31.1,50.175
P5V0A_MIXA: C154A.2 C289A.2 IC2A.21 L35A.1 | length 4.8
  TopLayer w0.203: C289A.2@28.798,26.845 C289A.2@28.819,26.866
  TopLayer w0.25: C154A.2@29.637,28.519 29.817,28.7 30.592,28.7 30.608,28.685 31.09,28.685 IC2A.21@31.1,28.675
  TopLayer w0.3: L35A.1@27.677,26.845 C289A.2@28.798,26.845 ; C289A.2@28.819,26.866 29.087,27.134 29.087,28.165 ; 29.262,28.359 29.477,28.359 C154A.2@29.637,28.519
  TopLayer w0.35: 29.087,28.165 29.262,28.341 29.262,28.359
P5V0A_MIXB: C154B.2 C289B.2 IC2B.21 L35B.1 | length 4.8
  TopLayer w0.203: C289B.2@28.798,47.845 C289B.2@28.819,47.866
  TopLayer w0.25: C154B.2@29.637,49.519 29.817,49.7 30.592,49.7 30.608,49.685 31.09,49.685 IC2B.21@31.1,49.675
  TopLayer w0.3: L35B.1@27.677,47.845 C289B.2@28.798,47.845 ; C289B.2@28.819,47.866 29.087,48.134 29.087,49.165 ; 29.262,49.359 29.477,49.359 C154B.2@29.637,49.519
  TopLayer w0.35: 29.087,49.165 29.262,49.341 29.262,49.359
P5V0HMCA: C22A.2 C23A.2 C24A.2 C277A.2 IC3A.2 L16A.2 | length 8.1
  TopLayer w0.3: L16A.2@17.325,47.55 C277A.2@18.875,47.55 19.075,47.75 C23A.2@19.075,48.75 19.075,49.26 19.163,49.348 19.503,49.348 20.054,49.898 20.723,49.898 C22A.2@20.825,50 20.675,50.15 C24A.2@20.675,51.4 ; IC3A.2@19.575,51.4 C24A.2@20.675,51.4 ; C24A.2@20.675,51.55 C24A.2@20.675,51.4
P5V0HMCB: C22B.2 C23B.2 C24B.2 C277B.2 IC3B.2 L16B.2 | length 8.1
  TopLayer w0.3: L16B.2@17.375,30.554 C277B.2@18.925,30.554 19.125,30.754 C23B.2@19.125,31.754 19.125,32.264 19.213,32.352 19.553,32.352 20.104,32.902 20.773,32.902 C22B.2@20.875,33.004 20.725,33.154 C24B.2@20.725,34.404 ; IC3B.2@19.625,34.404 C24B.2@20.725,34.404 ; C24B.2@20.725,34.554 C24B.2@20.725,34.404
P5V5: C139.2 C178.2 C211.2 C258.2 C259.2 C262.2 C263.2 C334.2 C335.2 C342.2 C343.2 C346.2 C347.2 IC14.3 IC20.3 IC22.12 IC22.13 IC22.14 IC22.15 IC22.16 IC22.17 IC22.18 IC22.19 IC22.20 IC22.21 IC30.3 IC31.3 IC32.3 L49.1 R18.2 R70.2 R82.2 R139.2 R140.2 R145.2 R154.2 R172.2 R217.2 TP8.1 | length 243.4
  TopLayer w0.25: 52.338,5.04 L49.1@53.075,5.04 ; 52.338,6.54 L49.1@53.787,6.54 ; 53.075,3.865 L49.1@53.075,5.04 ; L49.1@53.75,5.79 55.163,5.79 ; 54.375,3.853 L49.1@54.375,5.04 ; 55.163,5.04 L49.1@54.375,5.04 ; C347.2@87.8,3.675 87.875,3.75 IC32.3@87.875,5.2 89.625,5.2 C346.2@89.675,5.25 97.95,5.25 97.975,5.275 ; IC14.3@94.1,13.125 95.9,13.125 C263.2@95.925,13.1 97.95,13.1 C262.2@97.975,13.125 97.975,5.275 ; v1(101.5,6.4) v1(100.75,6.4) v1(100.75,5.275) ; v1(102.25,3.025) v1(101.5,3.025) v1(100.75,3.025) v1(100.75,4.15) ; v1(102.25,4.15) v1(101.5,4.15) v1(100.75,4.15) ; v1(102.25,5.275) v1(101.5,5.275) v1(100.75,5.275) ; IC30.3@114.9,5.275 C343.2@116.55,5.275 ; C343.2@116.7,5.1 C342.2@118.525,5.1 126.791,5.1 127.533,5.842 ; IC20.3@127.4,11.125 129.225,11.125 C335.2@129.25,11.15 C334.2@131.225,11.15 ; 127.55,5.85 131.225,9.525 C334.2@131.225,11.15 ; IC31.3@128.725,19.6 128.725,17.8 C258.2@128.775,17.75 C259.2@128.775,15.75 132.225,15.75 133.35,14.625 133.35,11.15 ; R139.2@135.23,3.65 135.205,3.675 R154.2@134.245,3.675 134.245,5.07 134.845,5.67 134.845,6.42 135.15,6.725 138.875,6.725 139.325,7.175 C139.2@140.075,7.175 ; R18.2@139.4,6.02 140.57,6.02 140.4,6.19 C139.2@140.4,8.325 C139.2@140.4,9.175 ; C139.2@140.725,9.4 141,9.675 IC22.20@142.15,9.675 ; C178.2@140.85,11 141.175,10.675 IC22.18@142.15,10.675 ; IC22.21@142.15,9.175 C139.2@140.4,9.175 ; IC22.19@142.15,10.175 140.4,10.175 ; IC22.17@142.15,11.175 C178.2@140.4,11.175 ; IC22.16@142.15,11.675 140.05,11.675 C178.2@139.725,11.35 ; IC22.15@142.45,12.975 142.45,14.125 ; IC22.14@142.95,12.975 142.95,14.125 ; IC22.13@143.45,12.975 143.45,14.125 ; 143.823,13.629 143.823,14.125 ; IC22.12@143.95,12.975 143.95,13.629 ; v1(144.575,15.368) 143.823,14.616 143.823,14.125 ; v1(146.159,3.517) 146.203,3.473 147.657,3.473 R172.2@147.7,3.43 ; v1(149.715,75.59) 150.827,75.59 TP8.1@150.852,75.615 150.9,75.567 157.397,75.567 157.501,75.463 v1(158.147,75.463) ; L49.1@53.075,5.04 L49.1@54.375,5.04 ; 97.975,5.275 v1(100.75,5.275) ; v1(100.75,4.15) v1(100.75,5.275) ; C334.2@131.225,11.15 133.35,11.15 ; 133.35,11.15 136.575,11.15 136.825,11.4 136.875,11.35 C178.2@139.725,11.35 ; C178.2@139.725,11.35 139.725,12.35 139.95,12.575 141.125,12.575 141.65,13.1 141.65,13.725 142.05,14.125 142.45,14.125 ; C178.2@139.725,11.35 139.9,11.175 C178.2@140.4,11.175 ; C139.2@140.4,9.175 140.4,10.175 ; 140.4,10.175 C178.2@140.4,11.175 ; 142.45,14.125 142.95,14.125 ; 142.95,14.125 143.45,14.125 ; 143.45,14.125 143.823,14.125
  TopLayer w0.254: R82.2@143.72,34.625 143.57,34.475 143.57,30.375 R145.2@143.72,30.225 R70.2@143.72,25.575 R140.2@143.72,21.175 143.72,16.223 v1(144.575,15.368)
  SignalLayer1 w0.25: v1(144.575,15.368) 150.639,15.368 151.885,14.121 157.99,14.121 159.004,15.135 159.004,74.645 158.186,75.463 v1(158.147,75.463)
  BottomLayer w0.25: v1(139.3,8.325) 139.3,7.8 143.67,3.43 144.837,3.43 144.924,3.517 v1(146.159,3.517) ; v1(149.715,75.59) R217.2@150.825,75.59
  other v1: 59.475,2.7 60.6,2.7 61.725,2.7 114.93,3.313 116.055,3.313 117.18,3.313 59.475,3.65 60.6,3.65 61.725,3.65 114.93,4.063 116.055,4.063 117.18,4.063 118.305,4.063 119.43,4.063 61.725,4.6
P5V5A: C132.2 C156.1 C195.2 C256.2 C332.2 C367.2 IC19.10 IC21.2 IC25.10 IC28.4 IC36.10 L49.2 R132.1 R223.1 | length 127
  TopLayer w0.25: IC21.2@38.57,12.639 38.57,14.51 38.963,14.904 39.274,14.904 R132.1@39.434,15.063 ; 42.775,2.696 42.775,3.13 ; C132.2@43.175,4.47 43.725,4.47 C132.2@43.725,4.104 ; C132.2@43.275,4.345 C132.2@43.275,4.056 ; 43.725,2.654 43.725,4.056 C132.2@43.275,4.056 ; 43.827,3.68 43.277,3.13 42.775,3.13 ; 44.227,3.65 48.175,3.65 48.46,3.365 49.725,3.365 L49.2@49.725,4.55 ; 45.186,3.323 48.011,3.323 ; 45.186,4.569 48.011,4.569 ; 48.138,5.04 L49.2@48.875,5.04 ; 48.138,6.54 50.963,6.54 ; L49.2@48.875,5.8 L49.2@48.875,5.04 ; 49.05,3.375 L49.2@49.05,4.55 ; L49.2@49.55,5.79 L49.2@49.55,5.04 ; 50.175,3.853 L49.2@50.175,5.04 ; L49.2@50.175,5.788 L49.2@50.175,5.04 ; 50.963,5.04 L49.2@50.175,5.04 ; IC25.10@70.05,8.125 70.05,6.825 70.075,6.8 70.075,5.855 R223.1@70.07,5.85 v1(70.7,5.85) ; v1(91.883,25.222) C367.2@92.529,25.222 IC19.10@92.529,26.597 ; IC36.10@100.15,26.589 100.15,26.399 100.196,26.353 101.742,26.353 101.986,26.109 102.462,26.109 C195.2@102.525,26.046 v1(103.143,26.046) ; v1(102.033,15.12) C332.2@102.678,15.12 IC28.4@103.693,15.12 ; 42.775,3.13 42.775,4.056 C132.2@43.275,4.056 ; L49.2@48.875,5.04 L49.2@49.55,5.04 ; L49.2@49.55,5.04 L49.2@50.175,5.04
  MidLayer2 w0.25: v1(102.033,15.12) 102.558,15.645 102.558,25.46 v1(103.143,26.046)
  SignalLayer1 w0.25: v1(91.883,25.222) 93.147,26.485 102.704,26.485 v1(103.143,26.046)
  BottomLayer w0.25: v1(51.3,5.298) 51.3,6.413 56.262,11.374 60.112,11.374 62.172,9.315 62.172,7.908 62.63,7.45 69.1,7.45 v1(70.7,5.85) 73.537,8.687 85.471,8.687 93.06,16.276 95.284,16.276 95.333,16.325 100.828,16.325 v1(102.033,15.12)
P11V5A: C179.2 C228A.1 C228B.1 C229A.2 C229B.2 C239A.2 C239B.2 D1A.2 D1B.2 D2A.2 D2B.2 D6.1 IC7.5 IC15A.8 IC15B.8 IC16A.8 IC16B.8 R20.2 R219.2 TP9.1 | length 253.5
  TopLayer w0.25: D1B.2@32.8,88.305 32.8,90.905 35.32,93.425 41.85,93.425 ; D1A.2@32.85,71.255 32.85,70.4 33.436,69.814 v1(35.007,69.814) ; D2B.2@34.7,82.08 D2B.2@34.7,82.105 v1(34.7,83.1) ; D2A.2@34.75,65.055 v1(34.75,66.075) ; IC16B.8@37.3,87.405 37.3,88.855 C229B.2@37.4,88.955 37.625,89.18 C228B.1@37.625,90.43 ; IC16A.8@37.35,70.38 37.35,71.83 C229A.2@37.45,71.93 37.675,72.155 37.675,73.405 v1(37.675,74.45) ; v1(37.625,91.475) C228B.1@37.625,90.43 ; C228A.1@37.675,73.405 C228A.1@38.325,73.405 ; v1(38.275,89.385) C228B.1@38.275,90.43 ; v1(38.275,91.475) C228B.1@38.275,90.43 ; v1(38.325,72.36) C228A.1@38.325,73.405 ; v1(38.325,74.45) C228A.1@38.325,73.405 ; v1(38.925,89.385) v1(38.925,91.475) ; v1(38.975,72.36) v1(38.975,74.45) 42.294,77.769 45.619,77.769 46.9,79.05 C239B.2@46.9,80.48 45.55,80.48 IC15B.8@45.55,80.805 ; 42.525,95.305 42.525,94.1 41.85,93.425 ; IC15A.8@45.6,63.78 45.6,63.455 C239A.2@46.95,63.455 v1@46.95,62.025 ; R20.2@47.425,94.105 47.425,93.175 47.45,93.15 ; IC7.5@48.725,93.15 47.45,93.15 ; v1(148.764,72.429) 148.831,72.429 148.939,72.321 150.679,72.321 TP9.1@150.704,72.346 ; C228B.1@37.625,90.43 C228B.1@38.275,90.43 ; 41.85,93.425 42.15,93.125 45.725,93.125 45.75,93.15 47.45,93.15
  MidLayer2 w0.25: v1(34.7,83.1) 38.275,86.675 v1(38.275,89.385) ; v1(34.75,66.075) 37.675,69 38.975,69 ; v1(35.007,69.814) 37.861,69.814 38.325,70.277 v1(38.325,72.36) ; v1(38.925,89.385) 39.375,88.935 39.375,83.658 39.325,83.608 39.325,82.358 39.927,81.756 39.927,75.402 v1(38.975,74.45)
  BottomLayer w0.1: v1(38.925,89.385) 39.486,88.824 59.644,88.824 61.95,91.13 61.95,91.668 63.5,93.218 76.149,93.218 78.24,91.127 84.371,91.127 88.849,95.605 92.559,95.605 93.404,96.45 134.512,96.45 135.611,95.352 143.84,95.352 145.809,93.383 145.809,77.077 148.768,74.118 148.768,72.433 v1(148.764,72.429)
  BottomLayer w0.25: v1(38.975,72.36) 38.975,68.487 41.795,65.667 41.795,62.801 42.608,61.988 44.954,61.988 45.321,62.355 45.772,62.355 46.122,62.005 v1(46.93,62.005) ; v1(148.764,72.429) 149.654,72.429 149.971,72.746 R219.2@151.066,72.746
P12V0: C181.2 C182.2 C249.2 C253.2 C268.2 IC22.1 IC22.2 IC22.39 IC22.52 IC23.2 J1.28 J1.29 J12.28 J12.29 LD1.2 LD9.2 LD10.2 LD12.2 LD13.2 R218.2 R278.2 T16.2 TP18.1 | length 168
  TopLayer w0.125: IC22.39@148.45,5.375 148.45,5.95 v1(148.725,6.225)
  TopLayer w0.25: v1(115.95,88.767) 115.95,89.242 C249.2@116.35,89.642 116.75,89.242 v1(116.75,88.767)
  TopLayer w0.254: v1(135.488,68.52) 135.865,68.143 137.61,68.143 138.795,69.328 C268.2@140.105,69.328 140.105,69.503 141.24,70.638 145.482,70.638 TP18.1@148.795,73.951 148.834,73.99 R218.2@150.482,73.99 150.482,73.97 151.152,73.3 v1(153.361,73.3) ; IC22.2@148.95,12.975 IC22.1@149.45,12.975 ; IC22.52@149.75,11.675 149.45,11.675 IC22.1@149.45,12.975 ; v1(150.315,12.975) IC22.1@149.45,12.975 ; LD10.2@155.917,89.916 LD1.2@155.917,88.556 LD9.2@155.917,87.196 LD12.2@155.917,85.835 LD13.2@155.917,84.475 v1(156.782,84.475) ; 157.7,12.37 156.005,12.37 156,12.375 156,13.65 155.7,13.95 C253.2@153.8,13.95 C181.2@151.825,13.95 151.65,14.125 C182.2@149.475,14.125 149.45,14.1 IC22.1@149.45,12.975
  TopLayer w0.5: IC23.2@111.425,91.317 111.425,90.074 111.857,89.642 C249.2@116.35,89.642
  MidLayer2 w0.25: v1(116.75,88.767) 121.209,88.767 121.715,89.273 147.929,89.273 152.887,84.314 152.887,84.116 153.215,83.788 153.251,83.788 155.541,81.498 157.243,79.797 157.243,24.367 J1.28@155.654,22.778
  MidLayer2 w0.254: 155.541,81.498 156.782,82.738 v1(156.782,84.475)
  BottomLayer w0.25: v1(148.725,6.225) 149.575,7.075 150.85,7.075 151.775,8 151.775,8.9 150.05,10.625 150.05,12.71 v1(150.315,12.975)
  BottomLayer w0.254: v1(135.488,68.52) 136.155,68.52 T16.2@136.278,68.643 136.349,68.573 136.349,67.432 R278.2@136.419,67.362
  other v1: 152.675,16.25 153.8,16.25 154.925,16.25 156.05,16.25 152.675,17 153.8,17 154.925,17 156.05,17 152.675,17.75 153.8,17.75 154.925,17.75 156.05,17.75
P12V0A: C245.2 C364.1 IC7.1 L45.2 | length 34
  TopLayer w0.25: IC7.1@51.425,93.15 53,93.15 C245.2@53.025,93.125 ; v1(53.025,92.225) C245.2@53.025,93.125 ; v1(53.925,93.125) C245.2@53.025,93.125 ; v1(78.65,92.592) v1(78.65,93.342) v1(78.65,94.092) v1(79.775,94.092) v1(79.775,93.342) v1(79.775,92.592)
  TopLayer w0.5: v1(79.775,92.592) C364.1@81.2,92.592 ; C364.1@82.7,92.592 84.125,92.592 L45.2@84.975,93.442
  BottomLayer w0.25: 57.366,96.4 64.937,96.4 65.732,95.605 67.642,95.605 67.757,95.72 69.543,95.72 69.658,95.605 70.092,95.605 70.207,95.72 77.022,95.72 v1(78.65,94.092)
P12V0F: C183.2 C255.1 L44.2 L45.1 | length 8.1
  TopLayer w0.5: L45.1@88.175,93.442 89.025,92.592 C255.1@90.45,92.592 ; C255.1@91.2,92.317 91.475,92.592 C183.2@93.9,92.592 ; C183.2@93.95,92.592 95.375,92.592 L44.2@96.225,93.442
P12V0S: C250.1 IC23.3 L44.1 | length 2.6
  TopLayer w0.5: L44.1@99.425,93.442 100.275,94.292 C250.1@101.7,94.292
PARITYCD_N: IC4.G18 U1.P8 | length 27.4
  TopLayer w0.095: v2(89.293,59.525) U1.P8@89.693,59.125 ; v2(107.675,57.325) IC4.G18@108.175,56.825
  BottomLayer w0.095: v2(89.293,59.525) 89.293,59.456 89.19,59.354 89.19,59.291 89.135,59.235 89.056,59.235 88.975,59.316 88.975,59.904 89.578,60.507 89.626,60.554 89.702,60.63 89.816,60.63 89.911,60.63 90.006,60.535 90.006,60.187 90.063,60.13 90.329,60.13 90.386,60.187 90.386,60.573 90.443,60.63 90.709,60.63 90.766,60.573 90.766,60.302 90.823,60.245 91.089,60.245 91.146,60.302 91.146,60.535 91.241,60.63 91.526,60.63 91.899,60.63 101.848,60.63 102.473,61.254 103.754,61.254 104.311,60.698 106.854,60.698 108.082,59.469 108.082,57.208 107.809,56.935 107.731,56.935 107.675,56.991 v2(107.675,57.325)
PARITYCD_P: IC4.G17 U1.N8 | length 27.4
  TopLayer w0.095: v2(89.293,58.725) U1.N8@89.693,58.325 ; v2(107.675,56.325) IC4.G17@108.175,55.825
  BottomLayer w0.095: v2(89.293,58.725) 89.293,58.794 89.19,58.896 89.19,58.959 89.135,59.015 88.965,59.015 88.755,59.225 88.755,59.995 89.611,60.85 90.084,60.85 91.899,60.85 101.757,60.85 102.382,61.474 103.845,61.474 104.402,60.918 106.945,60.918 108.302,59.56 108.302,57.117 107.9,56.715 107.731,56.715 107.675,56.659 v2(107.675,56.325)
PGOOD: IC19.9 IC20.5 IC25.9 IC28.3 IC30.5 IC36.9 R223.2 | length 112.7
  TopLayer w0.152: v1(69.375,5.125) 69.13,5.37 R223.2@69.13,5.85 69.4,6.12 IC25.9@69.4,8.125 ; v1(91.211,25.273) 91.211,25.28 91.879,25.947 IC19.9@91.879,26.597 ; v1(103.144,17.203) IC28.3@103.693,17.203 ; v1(125.875,12.85) 126.225,12.85 126.45,13.075 IC20.5@126.45,13.825
  TopLayer w0.25: IC36.9@99.5,26.589 99.519,26.57 99.519,26.108 99.813,25.814 101.337,25.814 v1(101.619,25.532) ; v1(113.95,7) IC30.5@113.95,7.975
  MidLayer2 w0.25: v1(101.619,25.532) 101.619,26.447 102.675,27.503 103.329,27.503 103.675,27.157 103.675,19.875 103.144,19.344 v1(103.144,17.203)
  SignalLayer1 w0.125: v1(69.375,5.125) 72.572,5.125 74.872,7.425 113.525,7.425 v1(113.95,7)
  SignalLayer1 w0.25: v1(91.211,25.273) 91.259,25.225 91.259,25.059 91.662,24.656 94.517,24.656 95.686,25.825 101.117,25.825 101.363,25.58 101.571,25.58 v1(101.619,25.532)
  BottomLayer w0.25: v1(103.144,17.203) 104.554,17.203 105.378,16.379 105.378,16.359 106.125,15.612 108.628,15.612 113.95,10.29 v1(113.95,7) 119.051,7 124.901,12.85 v1(125.875,12.85)
PLLAVDD33: C308.2 C309.2 C1009.2 L14.1 U1.C11 U1.D11 | length 8.3
  TopLayer w0.2: v2(86.893,49.925) U1.C11@87.293,50.325 ; v2(86.893,50.725) U1.D11@87.293,51.125
  BottomLayer w0.125: C308.2@86.443,48.6 86.493,48.65 86.493,49.525 v2(86.893,49.925) v2(86.893,50.725)
  BottomLayer w0.25: C1009.2@85.113,47.421 86.163,47.421 C309.2@86.243,47.5 ; C308.2@86.443,48.6 86.443,47.7 C309.2@86.243,47.5 ; C309.2@86.516,47.226 C309.2@86.243,47.5
  BottomLayer w0.5: C309.2@86.516,47.226 86.516,46.796 86.727,46.586 86.727,45.739 L14.1@87.141,45.325
REF_P1V7066: IC12.7 R7.2 R72A.1 R72B.1 RN1.7 RN4A.5 RN4A.8 RN4B.5 RN4B.8 | length 74.8
  TopLayer w0.3: R72B.1@42.05,81.93 42.745,82.625 v1@43.025,82.625 ; R72A.1@42.1,64.905 42.795,65.6 v1@43.075,65.6 ; R7.2@61.678,88.437 61.728,88.437 62.028,88.137 62.028,88.087 62.86,87.255 62.86,87.184 63.182,86.862 64.187,86.862 65.293,87.968 65.293,88.945 IC12.7@65.31,88.962 65.124,89.148 65.124,92.409 v1(65.05,92.483) 65.153,92.483 64.161,93.475 63.671,93.475 RN1.7@63.387,93.759
  MidLayer2 w0.3: v1(43.055,65.58) 43.055,65.634 43.005,65.684 v1(43.005,82.605) 43.005,83.78 46.403,87.178 58.282,87.178 63.195,92.091 64.485,92.091
  BottomLayer w0.3: v1(43.005,82.605) 43.005,86.28 43.775,87.05 46.075,87.05 46.83,86.295 RN4B.8@46.83,85.78 ; v1(43.055,65.58) 43.055,69.255 43.825,70.025 46.125,70.025 46.88,69.27 RN4A.8@46.88,68.755
REF_P2V048: IC12.1 R138A.1 R138B.1 RN1.3 RN2.6 | length 76.6
  TopLayer w0.3: R138B.1@44.545,79.23 45.17,79.23 v1@45.525,78.875 ; R138A.1@44.595,62.205 45.22,62.205 v1@45.575,61.85 ; v1(64.05,82.575) 64.05,82.8 64.66,83.41 IC12.1@64.66,84.562 ; RN1.3@68.779,94.989 68.878,94.889 69.986,94.889 70.59,94.285 70.59,87.372 70.299,87.081 70.299,86.429 v1(68.925,85.055)
  MidLayer2 w0.3: v1(45.505,78.855) 45.505,80.156 47.517,82.167 48.199,82.167 48.467,81.9 v1(64.05,81.9) 65.77,81.9 v1(68.925,85.055)
  SignalLayer1 w0.3: v1(45.555,61.83) 46.885,63.16 48.371,63.16 56.473,71.263 56.473,74.998 v1(64.05,82.575)
  BottomLayer w0.3: v1(64.05,81.9) 65.575,81.9 66.27,82.595 RN2.6@66.27,83.93
REF_P4V096: C85.2 IC11.6 IC11.7 R6.1 RN1.8 | length 19.9
  TopLayer w0.25: v1(63.25,90.75) RN1.8@63.25,92.32 ; IC11.6@72.67,88.05 72.67,87.2 C85.2@73.32,86.55 ; IC11.7@73.32,88.05 C85.2@73.32,86.55 ; v1(73.395,85.529) C85.2@73.395,86.475 ; R6.1@74.53,86.475 C85.2@73.395,86.475 ; C85.2@73.32,86.55 C85.2@73.395,86.475
  BottomLayer w0.25: v1@63.25,90.717 69.23,90.717 70.18,89.767 70.18,88.744 v1(73.395,85.529)
RF_OUT0: C272A.1 C370A.2 J5.1 | length 8.8
  TopLayer w0.19: J5.1@4.5,52.5 13.034,52.5 cw(c13.034,52.159) C370A.2@13.275,52.4
RF_OUT1: C272B.1 C370B.2 J6.1 | length 9
  TopLayer w0.19: J6.1@4.5,35.5 ccw(c4.732,35.732) 4.732,35.404 C370B.2@13.325,35.404 C370B.2@13.229,35.5
SATA_RX0_N: C204.1 J11.5 | length 3.2
  TopLayer w0.095: J11.5@123.2,89.66 123.955,89.66 124.5,90.204 125.818,90.204 C204.1@126.07,89.953
SATA_RX0_P: C203.1 J11.6 | length 3.2
  TopLayer w0.095: J11.6@123.2,90.93 123.954,90.93 124.496,90.388 125.806,90.388 C203.1@126.07,90.653
SATA_RX1_N: C193.1 J10.5 | length 3.2
  TopLayer w0.095: J10.5@132.675,89.655 133.43,89.655 133.975,90.199 135.293,90.199 C193.1@135.545,89.948
SATA_RX1_P: C192.1 J10.6 | length 3.2
  TopLayer w0.095: J10.6@132.675,90.925 133.429,90.925 133.971,90.383 135.281,90.383 C192.1@135.545,90.648
SATA_RX2_N: C186.1 J9.9 | length 2.3
  TopLayer w0.095: J9.9@145.825,59.345 146.425,59.345 146.633,59.138 146.883,59.138 146.893,59.128 147.756,59.128 147.964,59.335 C186.1@147.989,59.335
SATA_RX2_P: C185.1 J9.11 | length 2.3
  TopLayer w0.095: J9.11@145.825,58.71 146.425,58.71 146.633,58.917 146.792,58.917 146.802,58.908 147.756,58.908 147.964,58.7 C185.1@147.989,58.7
SATA_RX3_N: C199.1 J9.10 | length 6
  TopLayer w0.095: C199.1@138.133,62.253 138.133,62.228 137.926,62.021 137.926,61.886 138.894,60.918 138.982,60.918 140.762,59.138 141.418,59.138 141.625,59.345 J9.10@142.225,59.345